# Altium PCB PCB.PcbDoc (part 4 of 4)
Units mm, origin at the board's own origin, x right, y up, seen from the top; angles counter-clockwise.
Board outline 38 x 42 mm, 4 copper layers (Top Layer, Inner GND 1, Inner GND 2, Bottom Layer), stack 1.62 mm thick; 195 components, 172 nets, 763 pads, 474 vias.
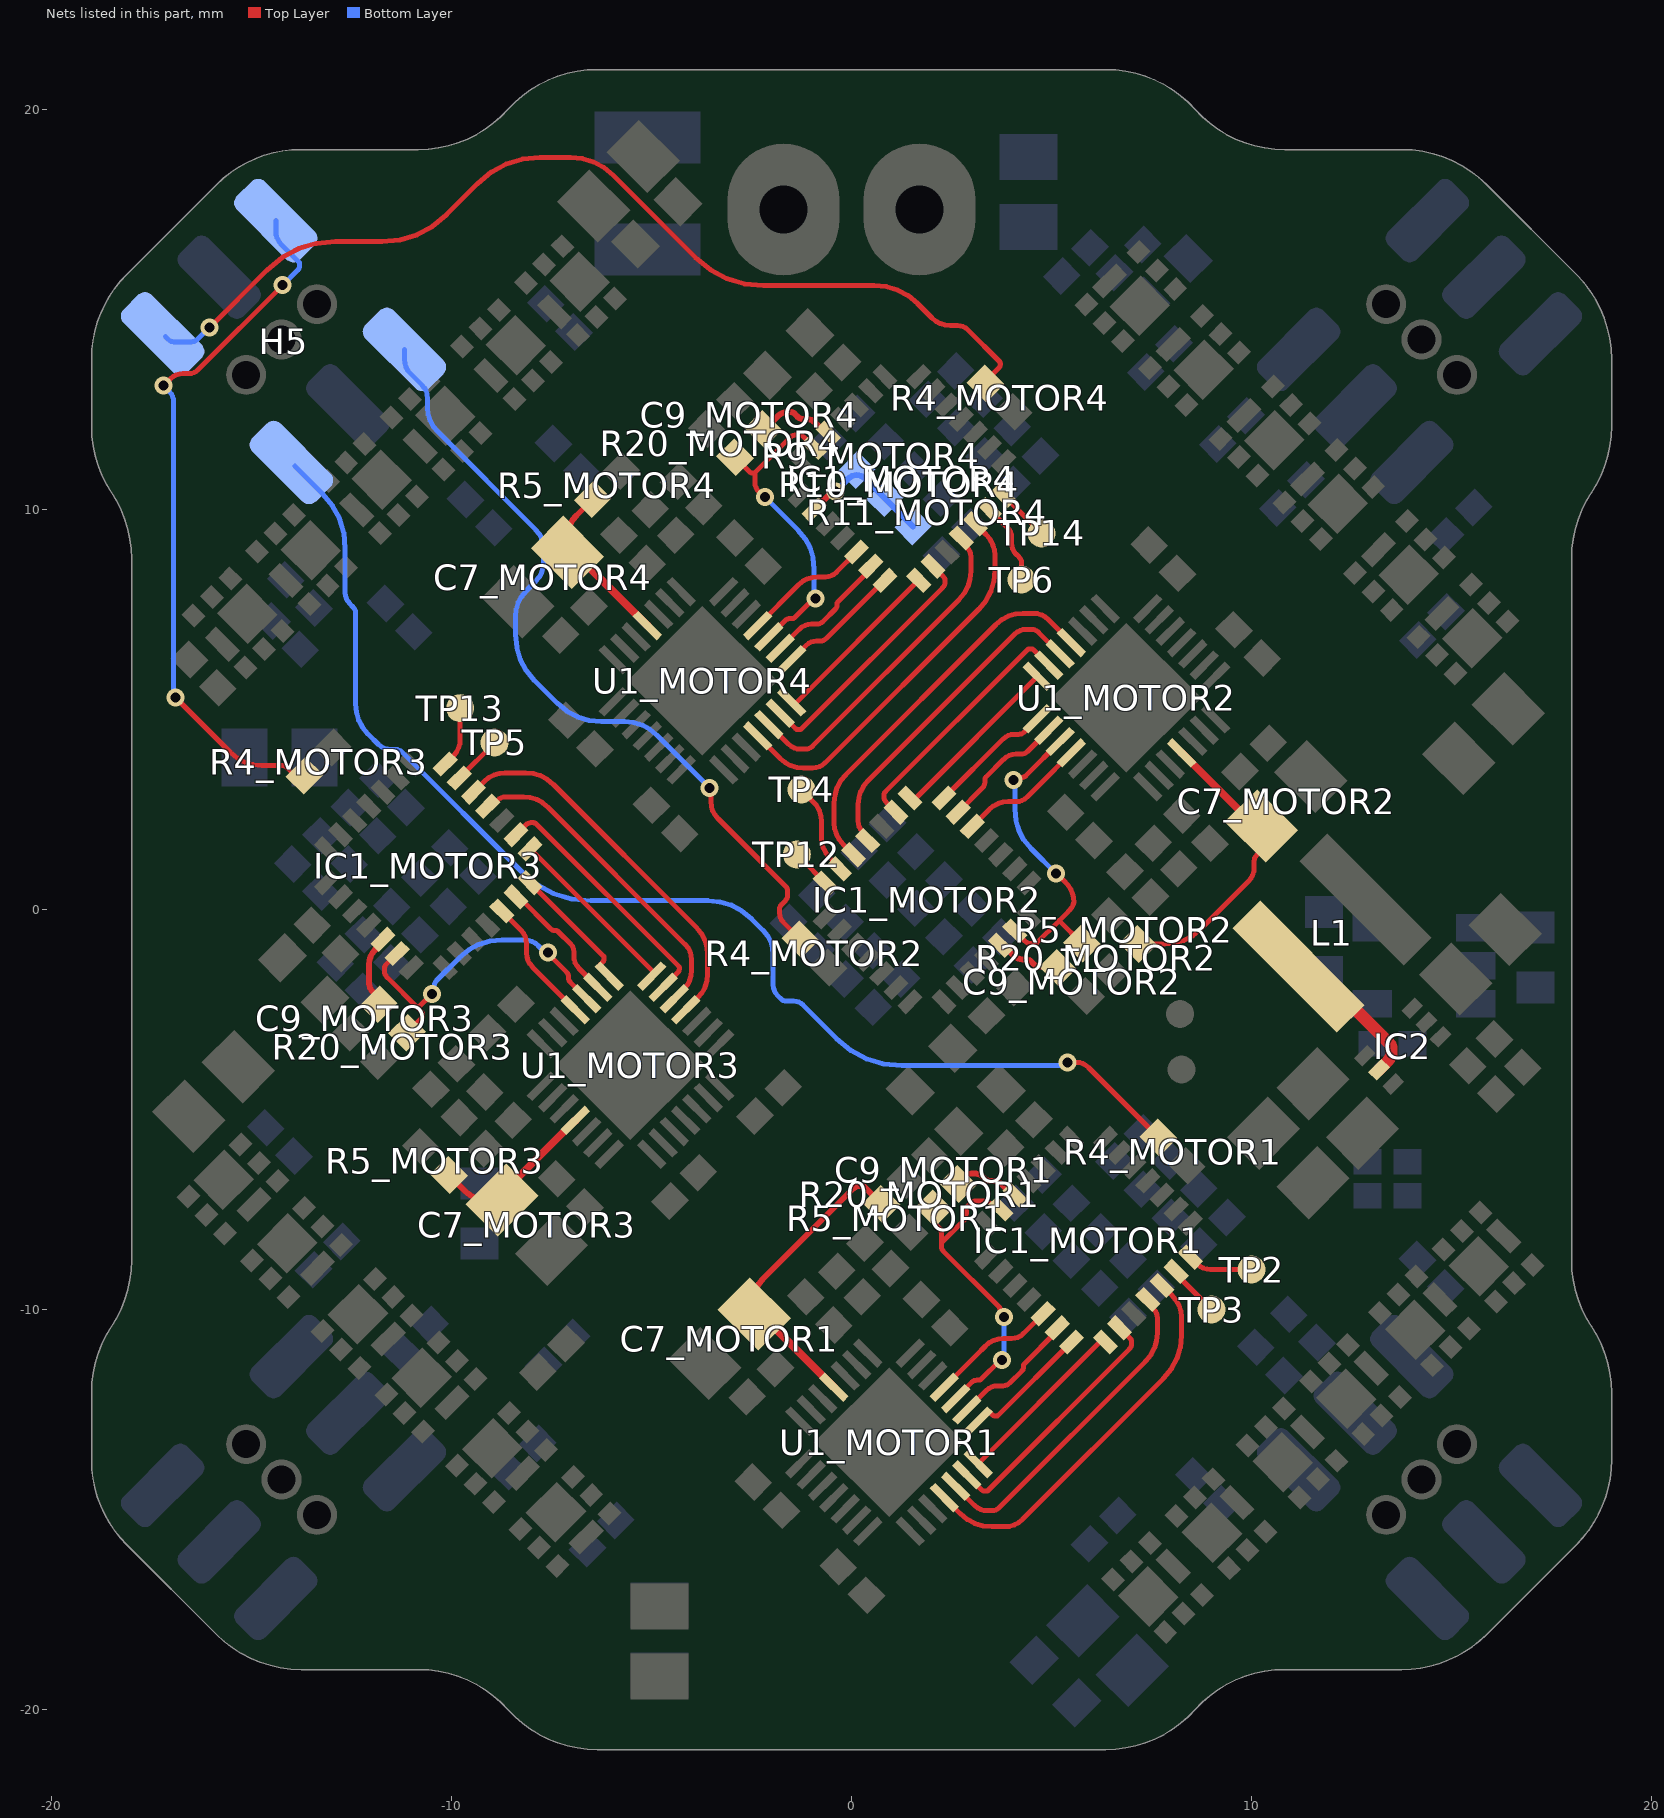
[diagram p6: the nets of this part, all layers, seen from the top]

## Via types
v1: diameter 0.45, hole 0.25, Top Layer to Bottom Layer, tented both sides, 381 vias
v2: diameter 0.55, hole 0.25, Top Layer to Bottom Layer, tented both sides, 93 vias

## Nets (pads, with @x,y where several pads share a name; then routed paths per layer and width w, separated by ;. In a path a pad name is that pad's centre, name@x,y a point inside that pad or via, vN(x,y) a via of type N, cw(c..) or ccw(c..) an arc to the next point about the centre after c; other vN are vias at no path point) (continued)
STM_BEMF_REF_MOTOR4: IC1_MOTOR4.9 R9_MOTOR4.2 R10_MOTOR4.2 R11_MOTOR4.2 | length 3.3
  Top Layer w0.15: IC1_MOTOR4.9@-0.934,9.998 -0.497,10.435 -0.485,10.445 -0.472,10.452 -0.458,10.456 -0.443,10.457 v1(-0.404,10.457)
  Bottom Layer w0.15: v1(-0.404,10.457) -0.112,10.749 0.007,10.838 0.126,10.868 0.246,10.838 0.365,10.749 R11_MOTOR4.2@1.541,9.573
STM_DSHOT1: H5.4 R4_MOTOR1.2 | length 31.7
  Top Layer w0.125: v1(5.4,-3.821) 5.619,-3.821 5.705,-3.829 5.785,-3.853 5.858,-3.892 5.925,-3.948 R4_MOTOR1.2@7.674,-5.697
  Bottom Layer w0.125: H5.4@-13.917,11.089 -13.225,10.397 -12.977,10.099 -12.8,9.772 -12.694,9.415 -12.659,9.029 -12.659,7.923 -12.652,7.844 -12.63,7.771 -12.593,7.704 -12.542,7.642 -12.464,7.564 -12.436,7.53 -12.416,7.493 -12.404,7.453 -12.4,7.409 -12.4,5.145 -12.38,4.931 -12.321,4.733 -12.223,4.551 -12.085,4.385 -11.827,4.127 -11.76,4.072 -11.687,4.032 -11.607,4.008 -11.52,4 -11.399,4 -11.351,3.996 -11.307,3.982 -11.267,3.961 -11.23,3.93 -8.228,0.928 -7.856,0.618 -7.447,0.397 -7.002,0.265 -6.52,0.22 -3.589,0.22 -3.283,0.192 -3.001,0.108 -2.742,-0.032 -2.506,-0.228 -2.205,-0.529 -2.097,-0.659 -2.02,-0.801 -1.974,-0.956 -1.959,-1.124 -1.959,-1.882 -1.951,-1.959 -1.93,-2.03 -1.895,-2.095 -1.846,-2.154 -1.77,-2.23 -1.738,-2.257 -1.702,-2.276 -1.663,-2.288 -1.621,-2.291 -1.449,-2.291 -1.381,-2.298 -1.319,-2.316 -1.261,-2.347 -1.209,-2.391 -0.379,-3.221 -0.022,-3.518 0.37,-3.73 0.798,-3.858 1.26,-3.9 5.271,-3.9 5.295,-3.898 5.317,-3.891 5.338,-3.88 5.357,-3.864 v1(5.4,-3.821)
STM_DSHOT2: H5.6 R4_MOTOR2.2 | length 20.2
  Top Layer w0.125: v1(-3.546,3.037) -3.53,3.021 -3.525,3.015 -3.521,3.007 -3.518,2.999 -3.517,2.99 -3.517,2.702 -3.506,2.581 -3.473,2.47 -3.418,2.368 -3.34,2.274 -2.866,1.8 -1.652,0.587 -1.629,0.559 -1.613,0.529 -1.603,0.496 -1.6,0.46 -1.6,0.37 -1.604,0.324 -1.617,0.283 -1.637,0.244 -1.666,0.209 -1.748,0.128 -1.771,0.101 -1.787,0.07 -1.797,0.037 -1.8,0.002 -1.8,-0.089 -1.794,-0.154 -1.776,-0.214 -1.746,-0.269 -1.705,-0.319 R4_MOTOR2.2@-1.283,-0.741
  Bottom Layer w0.125: H5.6@-11.177,14.006 -11.177,13.755 -11.168,13.657 -11.141,13.566 -11.096,13.482 -11.033,13.406 -10.735,13.109 -10.676,13.037 -10.634,12.959 -10.608,12.874 -10.6,12.782 -10.6,12.548 -10.585,12.38 -10.538,12.225 -10.462,12.083 -10.354,11.954 -7.898,9.498 -7.811,9.394 -7.749,9.28 -7.712,9.155 -7.7,9.02 -7.7,8.678 -7.712,8.544 -7.749,8.42 -7.811,8.307 -7.897,8.203 -8.137,7.963 -8.252,7.824 -8.334,7.673 -8.384,7.508 -8.4,7.329 -8.4,6.875 -8.37,6.55 -8.281,6.249 -8.132,5.974 -7.923,5.723 -7.36,5.16 -7.118,4.959 -6.852,4.815 -6.563,4.729 -6.249,4.7 -5.677,4.7 -5.452,4.679 -5.243,4.617 -5.052,4.514 -4.878,4.369 v1(-3.546,3.037)
STM_DSHOT3: H5.3 R4_MOTOR3.2 | length 17.9
  Top Layer w0.125: v1(-17.2,13.1) -17.035,13.265 -16.964,13.324 -16.886,13.366 -16.801,13.392 -16.709,13.4 -16.557,13.4 -16.497,13.406 -16.441,13.422 -16.39,13.45 -16.344,13.488 v1(-14.221,15.612) ; v1(-16.9,5.3) -15.527,3.927 -15.355,3.784 -15.166,3.682 -14.96,3.62 -14.737,3.6 -14.211,3.6 -14.192,3.598 -14.175,3.593 -14.159,3.584 -14.144,3.572 -14.113,3.541 -14.112,3.54 -14.11,3.539 -14.108,3.539 -14.106,3.538 -14.103,3.538 ; -14.099,3.537 -13.982,3.42 -13.944,3.388 -13.901,3.365 -13.855,3.351 -13.805,3.346 R4_MOTOR3.2@-13.679,3.346
  Bottom Layer w0.125: v1(-17.2,13.1) -17.062,12.962 -17.012,12.902 -16.977,12.837 -16.956,12.766 -16.949,12.689 -16.949,5.38 -16.947,5.365 -16.943,5.351 -16.936,5.338 -16.927,5.327 v1(-16.9,5.3) ; H5.3@-14.395,17.223 -14.395,16.973 -14.386,16.874 -14.358,16.783 -14.313,16.699 -14.25,16.623 -13.825,16.198 -13.814,16.185 -13.806,16.171 -13.802,16.155 -13.8,16.138 -13.8,16.096 -13.803,16.065 -13.811,16.037 -13.825,16.011 -13.845,15.987 v1(-14.221,15.612)
STM_DSHOT4: H5.1 R4_MOTOR4.2 | length 25
  Top Layer w0.125: v1(-16.049,14.549) -16.049,14.551 -14.607,15.993 -14.235,16.302 -13.827,16.523 -13.382,16.656 -12.9,16.7 -11.745,16.7 -11.29,16.742 -10.869,16.867 -10.483,17.076 -10.132,17.368 -9.344,18.156 -9.005,18.438 -8.633,18.639 -8.228,18.76 -7.789,18.8 -7.025,18.8 -6.724,18.772 -6.446,18.69 -6.19,18.551 -5.958,18.358 -3.907,16.307 -3.535,15.998 -3.127,15.777 -2.682,15.644 -2.2,15.6 0.564,15.6 0.87,15.572 1.153,15.488 1.413,15.347 1.65,15.15 2.009,14.791 2.109,14.707 2.22,14.648 2.34,14.612 2.47,14.6 2.652,14.6 2.723,14.593 2.789,14.574 2.85,14.541 2.905,14.495 3.699,13.701 3.707,13.691 3.713,13.681 3.716,13.669 3.717,13.657 3.717,13.626 3.715,13.603 3.709,13.582 3.699,13.563 3.685,13.546 3.364,13.225 3.356,13.216 3.351,13.206 3.348,13.195 3.346,13.183 R4_MOTOR4.2@3.346,13.154
  Bottom Layer w0.125: H5.1@-17.155,14.327 -17.081,14.252 -17.049,14.226 -17.014,14.207 -16.976,14.195 -16.934,14.192 -16.508,14.192 -16.466,14.195 -16.428,14.207 -16.393,14.226 -16.361,14.252 -16.287,14.327 -16.285,14.327 -16.067,14.545 -16.064,14.547 -16.062,14.548 -16.059,14.549 -16.056,14.549 v1(-16.049,14.549)
STM_MP_HA_MOTOR1: IC1_MOTOR1.16 U1_MOTOR1.20 | length 6.4
  Top Layer w0.125: U1_MOTOR1.20@2.881,-14.134 3.256,-14.509 3.274,-14.523 3.293,-14.534 3.313,-14.54 3.336,-14.542 3.367,-14.542 3.379,-14.541 3.391,-14.537 3.401,-14.532 3.411,-14.524 6.941,-10.994 6.966,-10.963 6.984,-10.93 6.995,-10.894 6.999,-10.855 6.999,-10.801 6.997,-10.779 6.991,-10.759 6.981,-10.741 6.967,-10.724 IC1_MOTOR1.16@6.7,-10.457
STM_MP_HA_MOTOR2: IC1_MOTOR2.16 U1_MOTOR2.20 | length 6.4
  Top Layer w0.125: IC1_MOTOR2.16@1.11,2.434 0.869,2.675 0.844,2.705 0.826,2.738 0.815,2.775 0.812,2.814 0.812,2.868 0.813,2.89 0.819,2.91 0.829,2.928 0.843,2.944 4.384,6.486 4.402,6.5 4.421,6.51 4.441,6.516 4.464,6.519 4.495,6.519 4.508,6.517 4.519,6.514 4.529,6.508 4.539,6.5 U1_MOTOR2.20@4.929,6.111
STM_MP_HA_MOTOR3: IC1_MOTOR3.16 U1_MOTOR3.20 | length 6.4
  Top Layer w0.125: IC1_MOTOR3.16@-8.391,1.873 -8.149,2.115 -8.119,2.14 -8.086,2.158 -8.05,2.168 -8.011,2.172 -7.956,2.172 -7.935,2.17 -7.915,2.164 -7.897,2.154 -7.88,2.14 -4.324,-1.416 -4.316,-1.425 -4.311,-1.436 -4.307,-1.447 -4.306,-1.459 -4.306,-1.491 -4.308,-1.513 -4.314,-1.534 -4.325,-1.553 -4.339,-1.57 U1_MOTOR3.20@-4.714,-1.945
STM_MP_HA_MOTOR4: IC1_MOTOR4.16 U1_MOTOR4.20 | length 6.4
  Top Layer w0.125: U1_MOTOR4.20@-1.783,4.906 -1.408,4.532 -1.391,4.517 -1.372,4.507 -1.351,4.501 -1.328,4.499 -1.297,4.499 -1.285,4.5 -1.273,4.503 -1.263,4.509 -1.253,4.517 2.277,8.047 2.302,8.077 2.32,8.11 2.331,8.146 2.334,8.186 2.334,8.24 2.332,8.262 2.326,8.281 2.317,8.3 2.303,8.316 IC1_MOTOR4.16@2.036,8.583
STM_MP_HB_MOTOR1: IC1_MOTOR1.18 U1_MOTOR1.19 | length 8.2
  Top Layer w0.125: U1_MOTOR1.19@2.598,-14.417 3.083,-14.902 3.15,-14.957 3.224,-14.997 3.305,-15.021 3.392,-15.029 3.513,-15.029 3.561,-15.025 3.605,-15.012 3.646,-14.99 3.683,-14.959 7.353,-11.289 7.481,-11.135 7.572,-10.966 7.627,-10.783 7.645,-10.584 7.645,-10.212 7.639,-10.148 7.622,-10.089 7.592,-10.034 7.551,-9.985 7.436,-9.869 7.423,-9.854 7.414,-9.838 7.409,-9.819 7.407,-9.8 IC1_MOTOR1.18@7.407,-9.75
STM_MP_HB_MOTOR2: IC1_MOTOR2.18 U1_MOTOR2.19 | length 8.2
  Top Layer w0.125: IC1_MOTOR2.18@0.403,1.727 0.403,1.776 0.401,1.796 0.396,1.814 0.387,1.831 0.374,1.846 0.272,1.948 0.225,2.005 0.192,2.067 0.172,2.134 0.165,2.207 0.165,2.628 0.18,2.795 0.226,2.948 0.302,3.089 0.409,3.217 4.07,6.878 4.137,6.934 4.211,6.974 4.291,6.998 4.378,7.006 4.5,7.006 4.548,7.001 4.592,6.988 4.632,6.966 4.669,6.936 U1_MOTOR2.19@5.212,6.394
STM_MP_HB_MOTOR3: IC1_MOTOR3.18 U1_MOTOR3.19 | length 8.1
  Top Layer w0.125: IC1_MOTOR3.18@-9.098,2.58 -9.048,2.58 -9.029,2.582 -9.01,2.588 -8.994,2.597 -8.979,2.609 -8.863,2.724 -8.814,2.766 -8.759,2.795 -8.7,2.813 -8.636,2.819 -8.204,2.819 -8.034,2.803 -7.877,2.756 -7.733,2.678 -7.602,2.569 -4.156,-0.877 -4.088,-0.959 -4.039,-1.049 -4.01,-1.147 -4,-1.253 -4,-1.523 -4.012,-1.655 -4.048,-1.777 -4.109,-1.889 -4.194,-1.991 U1_MOTOR3.19@-4.431,-2.228
STM_MP_HB_MOTOR4: IC1_MOTOR4.18 U1_MOTOR4.19 | length 8.2
  Top Layer w0.125: U1_MOTOR4.19@-2.066,4.624 -1.581,4.139 -1.514,4.083 -1.44,4.043 -1.36,4.019 -1.273,4.011 -1.151,4.011 -1.103,4.016 -1.059,4.029 -1.018,4.051 -0.981,4.082 2.689,7.752 2.817,7.906 2.908,8.074 2.963,8.258 2.981,8.457 2.981,8.828 2.975,8.893 2.957,8.952 2.928,9.006 2.887,9.056 2.771,9.171 2.759,9.186 2.75,9.203 2.744,9.221 2.743,9.241 IC1_MOTOR4.18@2.743,9.291
STM_MP_HC_MOTOR1: IC1_MOTOR1.19 U1_MOTOR1.18 | length 9.9
  Top Layer w0.125: U1_MOTOR1.18@2.316,-14.7 2.717,-15.101 2.89,-15.245 3.079,-15.347 3.286,-15.409 3.509,-15.429 3.828,-15.429 3.954,-15.418 4.07,-15.383 4.176,-15.326 4.273,-15.245 7.802,-11.716 7.996,-11.483 8.134,-11.227 8.218,-10.948 8.245,-10.647 8.245,-10.19 8.232,-10.041 8.191,-9.904 8.122,-9.778 8.027,-9.663 IC1_MOTOR1.19@7.76,-9.396
STM_MP_HC_MOTOR2: IC1_MOTOR2.19 U1_MOTOR2.18 | length 9.8
  Top Layer w0.125: IC1_MOTOR2.19@0.05,1.373 -0.217,1.64 -0.312,1.754 -0.381,1.88 -0.422,2.018 -0.435,2.166 -0.435,2.669 -0.417,2.867 -0.362,3.05 -0.272,3.218 -0.144,3.371 3.612,7.128 3.759,7.249 3.919,7.336 4.094,7.388 4.284,7.406 4.548,7.406 4.653,7.396 4.749,7.368 4.837,7.32 4.918,7.253 U1_MOTOR2.18@5.494,6.676
STM_MP_HC_MOTOR3: IC1_MOTOR3.19 U1_MOTOR3.18 | length 9.6
  Top Layer w0.125: IC1_MOTOR3.19@-9.452,2.934 -9.185,3.201 -9.07,3.296 -8.944,3.364 -8.807,3.405 -8.658,3.419 -8.156,3.419 -7.957,3.401 -7.774,3.346 -7.606,3.255 -7.454,3.128 -3.883,-0.443 -3.759,-0.592 -3.671,-0.755 -3.618,-0.933 -3.6,-1.125 -3.6,-1.614 -3.615,-1.782 -3.662,-1.937 -3.739,-2.08 -3.847,-2.209 U1_MOTOR3.18@-4.148,-2.511
STM_MP_HC_MOTOR4: IC1_MOTOR4.19 U1_MOTOR4.18 | length 9.9
  Top Layer w0.125: U1_MOTOR4.18@-2.349,4.341 -1.788,3.781 -1.661,3.675 -1.522,3.6 -1.37,3.555 -1.206,3.54 -0.977,3.54 -0.887,3.548 -0.803,3.573 -0.727,3.614 -0.657,3.672 3.184,7.513 3.357,7.722 3.482,7.951 3.556,8.201 3.581,8.472 3.581,8.851 3.567,8.999 3.526,9.137 3.458,9.263 3.363,9.377 IC1_MOTOR4.19@3.096,9.644
STM_MP_LA_MOTOR1: IC1_MOTOR1.13 U1_MOTOR1.23 | length 3.2
  Top Layer w0.125: U1_MOTOR1.23@2.881,-12.508 3.355,-12.034 3.422,-11.978 3.496,-11.939 3.576,-11.915 3.662,-11.907 3.784,-11.907 3.831,-11.902 3.875,-11.889 3.916,-11.867 3.953,-11.837 4.263,-11.526 4.28,-11.506 4.291,-11.485 4.298,-11.461 4.301,-11.436 4.301,-11.4 4.302,-11.386 4.306,-11.373 4.312,-11.362 4.321,-11.351 5.122,-10.55 5.131,-10.539 5.138,-10.526 5.143,-10.511 5.144,-10.496 IC1_MOTOR1.13@5.144,-10.457
STM_MP_LA_MOTOR2: IC1_MOTOR2.13 U1_MOTOR2.23 | length 3.2
  Top Layer w0.125: IC1_MOTOR2.13@2.666,2.434 3.27,3.038 3.297,3.07 3.315,3.104 3.326,3.142 3.33,3.183 3.33,3.24 3.332,3.262 3.338,3.283 3.349,3.302 3.363,3.319 3.8,3.756 3.867,3.812 3.941,3.851 4.021,3.875 4.108,3.883 4.229,3.883 4.276,3.888 4.32,3.901 4.361,3.923 4.398,3.953 U1_MOTOR2.23@4.929,4.484
STM_MP_LA_MOTOR3: IC1_MOTOR3.13 U1_MOTOR3.23 | length 3.2
  Top Layer w0.125: IC1_MOTOR3.13@-8.391,0.318 -8.352,0.318 -8.337,0.316 -8.322,0.312 -8.309,0.305 -8.298,0.295 -7.514,-0.488 -7.494,-0.505 -7.473,-0.516 -7.449,-0.523 -7.424,-0.526 -7.388,-0.526 -7.374,-0.527 -7.362,-0.531 -7.35,-0.537 -7.339,-0.546 -7.011,-0.874 -6.981,-0.911 -6.959,-0.951 -6.946,-0.995 -6.941,-1.043 -6.941,-1.164 -6.933,-1.251 -6.909,-1.331 -6.87,-1.404 -6.814,-1.471 U1_MOTOR3.23@-6.34,-1.945
STM_MP_LA_MOTOR4: IC1_MOTOR4.13 U1_MOTOR4.23 | length 3.2
  Top Layer w0.125: U1_MOTOR4.23@-1.783,6.533 -1.309,7.007 -1.242,7.062 -1.169,7.102 -1.088,7.126 -1.002,7.134 -0.881,7.134 -0.833,7.138 -0.789,7.151 -0.748,7.173 -0.712,7.204 -0.401,7.515 -0.384,7.534 -0.373,7.556 -0.366,7.579 -0.363,7.605 -0.363,7.64 -0.362,7.654 -0.358,7.667 -0.352,7.679 -0.343,7.69 0.457,8.49 0.467,8.502 0.474,8.515 0.478,8.529 0.48,8.545 IC1_MOTOR4.13@0.48,8.583
STM_MP_LB_MOTOR1: IC1_MOTOR1.14 U1_MOTOR1.22 | length 3.2
  Top Layer w0.125: U1_MOTOR1.22@3.164,-12.791 3.377,-12.578 3.386,-12.57 3.396,-12.565 3.406,-12.562 3.418,-12.561 3.434,-12.561 3.44,-12.561 3.446,-12.563 3.451,-12.566 3.456,-12.57 3.513,-12.626 3.53,-12.641 3.549,-12.651 3.57,-12.657 3.592,-12.659 3.623,-12.659 3.636,-12.658 3.647,-12.655 3.658,-12.649 3.667,-12.641 IC1_MOTOR1.14@5.498,-10.811
STM_MP_LB_MOTOR2: IC1_MOTOR2.14 U1_MOTOR2.22 | length 3.1
  Top Layer w0.125: IC1_MOTOR2.14@2.312,2.787 3.792,4.267 3.851,4.316 3.916,4.351 3.987,4.372 4.063,4.379 4.17,4.379 4.213,4.383 4.252,4.395 4.287,4.414 4.32,4.441 U1_MOTOR2.22@4.646,4.767
STM_MP_LB_MOTOR3: IC1_MOTOR3.14 U1_MOTOR3.22 | length 3.2
  Top Layer w0.125: IC1_MOTOR3.14@-8.037,0.671 -6.207,-1.159 -6.199,-1.169 -6.193,-1.179 -6.19,-1.191 -6.189,-1.203 -6.189,-1.234 -6.191,-1.257 -6.197,-1.278 -6.207,-1.297 -6.222,-1.314 -6.278,-1.37 -6.282,-1.375 -6.285,-1.38 -6.287,-1.386 -6.287,-1.393 -6.287,-1.409 -6.286,-1.42 -6.283,-1.431 -6.278,-1.441 -6.27,-1.449 U1_MOTOR3.22@-6.057,-1.662
STM_MP_LB_MOTOR4: IC1_MOTOR4.14 U1_MOTOR4.22 | length 3.1
  Top Layer w0.125: U1_MOTOR4.22@-1.5,6.25 -1.495,6.25 -1.493,6.25 -1.492,6.251 -1.49,6.251 -1.489,6.253 -1.134,6.608 -1.078,6.654 -1.017,6.687 -0.951,6.707 -0.879,6.713 -0.779,6.713 -0.739,6.717 -0.703,6.728 -0.669,6.746 -0.638,6.771 0.816,8.226 0.818,8.228 0.821,8.229 0.823,8.23 0.826,8.23 IC1_MOTOR4.14@0.833,8.23
STM_MP_LC_MOTOR1: IC1_MOTOR1.15 U1_MOTOR1.21 | length 4.4
  Top Layer w0.125: U1_MOTOR1.21@3.164,-13.851 6.174,-10.841 6.195,-10.824 6.218,-10.812 6.242,-10.804 6.269,-10.802 6.332,-10.802 6.334,-10.802 6.337,-10.803 6.339,-10.804 6.341,-10.806 IC1_MOTOR1.15@6.346,-10.811
STM_MP_LC_MOTOR2: IC1_MOTOR2.15 U1_MOTOR2.21 | length 4.4
  Top Layer w0.125: IC1_MOTOR2.15@1.464,2.787 1.469,2.782 1.471,2.781 1.473,2.779 1.476,2.779 1.478,2.778 1.543,2.778 1.569,2.781 1.593,2.788 1.614,2.8 1.634,2.816 U1_MOTOR2.21@4.646,5.828
STM_MP_LC_MOTOR3: IC1_MOTOR3.15 U1_MOTOR3.21 | length 4.5
  Top Layer w0.125: IC1_MOTOR3.15@-8.032,1.52 -4.959,-1.553 -4.955,-1.558 -4.952,-1.563 -4.95,-1.569 -4.95,-1.575 -4.95,-1.591 -4.951,-1.603 -4.954,-1.614 -4.959,-1.623 -4.967,-1.632 U1_MOTOR3.21@-4.997,-1.662
STM_MP_LC_MOTOR4: IC1_MOTOR4.15 U1_MOTOR4.21 | length 4.5
  Top Layer w0.125: U1_MOTOR4.21@-1.5,5.189 -1.477,5.167 -1.469,5.159 -1.459,5.154 -1.448,5.151 -1.437,5.15 -1.421,5.15 -1.414,5.15 -1.408,5.152 -1.403,5.155 -1.398,5.159 IC1_MOTOR4.15@1.673,8.23
STM_MP_NFAULT_MOTOR1: IC1_MOTOR1.6 R20_MOTOR1.1 U1_MOTOR1.24 | length 8.2
  Top Layer w0.125: R20_MOTOR1.1@2.057,-7.469 2.057,-7.765 2.059,-7.789 2.065,-7.811 2.077,-7.832 2.092,-7.851 2.134,-7.893 ; 2.136,-7.896 2.136,-7.899 2.136,-7.901 2.136,-7.902 2.137,-7.904 2.138,-7.905 2.197,-7.964 2.218,-7.989 2.233,-8.017 2.242,-8.047 2.245,-8.08 2.245,-8.336 ; U1_MOTOR1.24@2.598,-12.225 3.007,-11.816 3.034,-11.794 3.063,-11.778 3.095,-11.768 3.13,-11.765 3.178,-11.765 3.197,-11.764 3.215,-11.758 3.231,-11.75 3.246,-11.737 3.706,-11.277 3.713,-11.272 3.72,-11.268 3.728,-11.265 3.737,-11.264 v1(3.759,-11.264) ; IC1_MOTOR1.6@3.73,-7.487 3.662,-7.487 3.635,-7.485 3.61,-7.477 3.588,-7.465 3.567,-7.448 3.494,-7.375 3.445,-7.334 3.392,-7.306 3.334,-7.288 3.271,-7.283 3.112,-7.283 3.075,-7.286 3.041,-7.296 3.01,-7.313 2.981,-7.337 2.915,-7.403 2.894,-7.428 2.88,-7.454 2.872,-7.483 2.869,-7.514 2.869,-7.594 2.863,-7.651 2.848,-7.704 2.822,-7.752 2.785,-7.796 2.245,-8.336 ; v1(3.809,-10.181) 3.809,-10.133 3.807,-10.114 3.802,-10.096 3.793,-10.08 3.781,-10.065 3.716,-10.001 3.711,-9.995 3.708,-9.988 3.705,-9.98 3.705,-9.972 3.705,-9.961 3.704,-9.957 3.703,-9.953 3.701,-9.949 3.698,-9.946 2.295,-8.542 2.273,-8.516 2.257,-8.487 2.248,-8.456 2.245,-8.422 2.245,-8.336
  Bottom Layer w0.125: v1(3.759,-11.264) 3.787,-11.237 3.796,-11.225 3.803,-11.212 3.808,-11.198 3.809,-11.183 v1(3.809,-10.181)
STM_MP_NFAULT_MOTOR2: IC1_MOTOR2.6 R20_MOTOR2.1 U1_MOTOR2.24 | length 8
  Top Layer w0.125: v1(4.051,3.241) 4.085,3.275 4.1,3.287 4.116,3.296 4.134,3.301 4.153,3.303 4.241,3.303 4.276,3.306 4.308,3.316 4.337,3.332 4.364,3.354 U1_MOTOR2.24@5.212,4.201 ; IC1_MOTOR2.6@4.08,-0.536 4.331,-0.787 4.366,-0.816 4.405,-0.837 4.448,-0.85 4.494,-0.854 4.558,-0.854 4.583,-0.852 4.607,-0.845 4.62,-0.845 5.188,-0.276 ; v1(5.116,0.898) 5.127,0.898 5.132,0.897 5.136,0.896 5.14,0.894 5.143,0.891 ccw(c5.149,0.891) 5.145,0.887 5.354,0.678 cw(c4.863,0.186) 5.558,0.186 5.536,0.112 5.499,0.045 5.448,-0.017 ; 5.426,-0.039 5.188,-0.276 ; R20_MOTOR2.1@5.761,-0.849 5.188,-0.276
  Bottom Layer w0.125: v1(4.051,3.241) 4.067,3.225 4.073,3.218 4.077,3.21 4.079,3.202 4.08,3.193 4.08,2.508 4.106,2.231 4.182,1.975 4.309,1.74 4.487,1.526 v1(5.116,0.898)
STM_MP_NFAULT_MOTOR3: IC1_MOTOR3.6 R20_MOTOR3.1 U1_MOTOR3.24 | length 8.3
  Top Layer w0.125: IC1_MOTOR3.6@-11.361,-1.097 -11.642,-1.378 -11.658,-1.397 -11.67,-1.419 -11.677,-1.442 -11.679,-1.467 -11.679,-1.532 -11.675,-1.577 -11.662,-1.62 -11.641,-1.659 -11.611,-1.694 -10.844,-2.462 ; R20_MOTOR3.1@-11.113,-3.077 -10.758,-2.721 -10.743,-2.704 -10.733,-2.684 -10.726,-2.663 -10.724,-2.64 -10.724,-2.608 -10.725,-2.595 -10.729,-2.583 -10.735,-2.573 -10.743,-2.563 -10.844,-2.462 ; v1(-10.491,-2.109) -10.844,-2.462 ; v1(-7.584,-1.067) -7.584,-1.09 -7.583,-1.098 -7.58,-1.106 -7.576,-1.114 -7.571,-1.121 -7.111,-1.581 -7.098,-1.595 -7.09,-1.612 -7.084,-1.629 -7.083,-1.648 -7.083,-1.697 -7.08,-1.731 -7.07,-1.763 -7.054,-1.792 -7.032,-1.819 U1_MOTOR3.24@-6.623,-2.228
  Bottom Layer w0.125: v1(-10.491,-2.109) -10.459,-2.077 -10.448,-2.064 -10.44,-2.049 -10.435,-2.032 -10.433,-2.015 -10.433,-1.915 -10.43,-1.876 -10.419,-1.839 -10.401,-1.806 -10.376,-1.776 -9.802,-1.202 -9.571,-1.01 -9.316,-0.872 -9.039,-0.789 -8.739,-0.762 -8.172,-0.762 -8.078,-0.77 -7.991,-0.796 -7.912,-0.839 -7.84,-0.899 -7.7,-1.039 -7.685,-1.052 -7.669,-1.06 -7.651,-1.066 -7.632,-1.067 v1(-7.584,-1.067)
STM_MP_NFAULT_MOTOR4: IC1_MOTOR4.6 R20_MOTOR4.1 U1_MOTOR4.24 | length 7.9
  Top Layer w0.125: R20_MOTOR4.1@-2.914,11.306 -2.559,10.951 -2.541,10.936 -2.522,10.925 -2.501,10.919 -2.478,10.917 -2.419,10.917 ; v1(-2.169,10.319) -2.18,10.319 -2.185,10.319 -2.189,10.32 -2.193,10.322 -2.196,10.325 -2.316,10.445 -2.361,10.499 -2.393,10.559 -2.413,10.624 -2.419,10.694 -2.419,10.917 ; U1_MOTOR4.24@-2.066,6.816 -1.657,7.224 -1.63,7.247 -1.601,7.263 -1.569,7.272 -1.534,7.275 -1.486,7.275 -1.467,7.277 -1.449,7.282 -1.433,7.291 -1.418,7.303 -0.958,7.763 -0.951,7.769 -0.944,7.773 -0.936,7.775 -0.927,7.776 v1(-0.905,7.776) ; IC1_MOTOR4.6@-0.934,11.553 -1.215,11.834 -1.235,11.851 -1.256,11.862 -1.28,11.869 -1.305,11.871 -1.369,11.871 -1.415,11.867 -1.458,11.855 -1.497,11.834 -1.532,11.804 -2.419,10.917
  Bottom Layer w0.125: v1(-2.169,10.319) -1.335,9.485 -1.16,9.274 -1.035,9.043 -0.959,8.79 -0.934,8.517 -0.934,7.824 -0.934,7.815 -0.931,7.807 -0.927,7.799 -0.921,7.792 v1(-0.905,7.776)
STM_MP_NSLEEP_MOTOR1: IC1_MOTOR1.12 U1_MOTOR1.25 | length 3.2
  Top Layer w0.125: U1_MOTOR1.25@2.316,-11.942 3.118,-11.139 3.347,-10.91 3.446,-10.828 3.554,-10.77 3.672,-10.735 3.8,-10.723 4.004,-10.723 4.085,-10.715 4.159,-10.693 4.227,-10.656 4.289,-10.605 IC1_MOTOR1.12@4.791,-10.104
STM_MP_NSLEEP_MOTOR2: IC1_MOTOR2.12 U1_MOTOR2.25 | length 3.2
  Top Layer w0.125: IC1_MOTOR2.12@3.019,2.08 3.436,2.497 3.543,2.585 3.66,2.649 3.787,2.687 3.925,2.699 4.118,2.699 4.193,2.706 4.264,2.727 4.328,2.762 4.386,2.811 4.692,3.116 U1_MOTOR2.25@5.494,3.919
STM_MP_NSLEEP_MOTOR3: IC1_MOTOR3.12 U1_MOTOR3.25 | length 3.2
  Top Layer w0.125: IC1_MOTOR3.12@-8.744,-0.036 -8.263,-0.517 -8.203,-0.59 -8.16,-0.67 -8.134,-0.757 -8.125,-0.851 -8.125,-1.09 -8.116,-1.187 -8.09,-1.277 -8.045,-1.359 -7.982,-1.434 -7.808,-1.609 U1_MOTOR3.25@-6.906,-2.511
STM_MP_NSLEEP_MOTOR4: IC1_MOTOR4.12 U1_MOTOR4.25 | length 3.2
  Top Layer w0.125: U1_MOTOR4.25@-2.349,7.099 -1.332,8.115 -1.225,8.204 -1.108,8.267 -0.981,8.305 -0.843,8.318 -0.65,8.318 -0.575,8.325 -0.504,8.346 -0.44,8.38 -0.382,8.429 IC1_MOTOR4.12@0.126,8.937
STM_nRESET1: C9_MOTOR1.2 IC1_MOTOR1.5 | length 1.9
  Top Layer w0.15: C9_MOTOR1.2@2.489,-6.95 2.72,-6.719 2.781,-6.669 2.848,-6.632 2.921,-6.611 2.999,-6.603 3.109,-6.603 3.153,-6.607 3.193,-6.619 3.23,-6.639 3.263,-6.667 3.325,-6.729 3.352,-6.752 3.382,-6.767 3.414,-6.777 3.448,-6.78 3.567,-6.78 3.614,-6.784 3.657,-6.797 3.696,-6.819 3.733,-6.849 3.997,-7.113 4.008,-7.122 4.02,-7.129 4.033,-7.132 4.047,-7.134 IC1_MOTOR1.5@4.083,-7.134
STM_nRESET2: C9_MOTOR2.2 IC1_MOTOR2.5 | length 1.3
  Top Layer w0.15: IC1_MOTOR2.5@3.727,-0.89 3.763,-0.89 3.777,-0.891 3.79,-0.895 3.802,-0.901 3.813,-0.911 4.055,-1.152 4.103,-1.192 4.156,-1.22 4.213,-1.238 4.276,-1.243 4.363,-1.243 4.397,-1.246 4.428,-1.256 4.458,-1.272 4.484,-1.294 4.554,-1.363 4.584,-1.388 4.616,-1.406 4.652,-1.416 4.691,-1.42 C9_MOTOR2.2@4.886,-1.42
STM_nRESET3: C9_MOTOR3.2 IC1_MOTOR3.5 | length 1.9
  Top Layer w0.15: C9_MOTOR3.2@-11.767,-2.38 -11.767,-2.32 -11.769,-2.296 -11.776,-2.274 -11.787,-2.254 -11.802,-2.236 -11.933,-2.106 -11.992,-2.034 -12.034,-1.956 -12.059,-1.871 -12.068,-1.779 -12.068,-1.388 -12.058,-1.279 -12.028,-1.179 -11.978,-1.087 -11.909,-1.003 -11.735,-0.83 -11.726,-0.819 -11.719,-0.807 -11.716,-0.794 -11.714,-0.779 IC1_MOTOR3.5@-11.714,-0.743
STM_nRESET4: C9_MOTOR4.2 IC1_MOTOR4.5 | length 2.1
  Top Layer w0.15: C9_MOTOR4.2@-2.26,11.96 -2.237,11.96 -2.228,11.961 -2.219,11.963 -2.211,11.967 -2.204,11.973 -1.828,12.349 -1.782,12.388 -1.731,12.415 -1.676,12.432 -1.616,12.437 -1.533,12.437 -1.5,12.434 -1.47,12.425 -1.442,12.41 -1.416,12.389 -1.346,12.318 -1.315,12.293 -1.282,12.275 -1.245,12.264 -1.206,12.26 -1.093,12.26 -1.048,12.256 -1.007,12.244 -0.969,12.224 -0.935,12.195 -0.668,11.928 -0.657,11.919 -0.644,11.912 -0.631,11.908 -0.617,11.907 IC1_MOTOR4.5@-0.581,11.907
STM_SWCLK1: IC1_MOTOR1.21 TP2.1 | length 1.6
  Top Layer w0.125: IC1_MOTOR1.21@8.468,-8.689 8.638,-8.86 8.712,-8.921 8.793,-8.965 8.881,-8.991 8.976,-9 TP2.1@10,-9
STM_SWCLK2: IC1_MOTOR2.21 TP12.1 | length 1
  Top Layer w0.125: TP12.1@-1.308,1.383 ccw(c-1.147,1.383) -1.261,1.269 IC1_MOTOR2.21@-0.657,0.666
STM_SWCLK3: IC1_MOTOR3.21 TP13.1 | length 1.5
  Top Layer w0.125: IC1_MOTOR3.21@-10.159,3.641 -9.953,3.847 -9.879,3.936 -9.826,4.033 -9.795,4.139 -9.784,4.254 TP13.1@-9.784,5.034
STM_SWCLK4: IC1_MOTOR4.21 TP14.1 | length 1.5
  Top Layer w0.125: IC1_MOTOR4.21@3.803,10.351 4.701,9.454 4.722,9.428 4.738,9.399 4.747,9.368 4.75,9.335 TP14.1@4.75,9.25
STM_SWDIO1: IC1_MOTOR1.20 TP3.1 | length 1.3
  Top Layer w0.125: IC1_MOTOR1.20@8.114,-9.043 8.114,-9.082 8.115,-9.097 8.12,-9.112 8.127,-9.125 8.137,-9.137 TP3.1@9,-10
STM_SWDIO2: IC1_MOTOR2.20 TP4.1 | length 2.3
  Top Layer w0.125: TP4.1@-1.25,3 ccw(c-1.202,3) -1.236,2.966 -0.877,2.607 -0.806,2.477 -0.764,2.335 -0.75,2.182 -0.75,1.784 -0.737,1.647 -0.7,1.521 -0.637,1.405 -0.549,1.299 -0.315,1.065 -0.31,1.059 -0.307,1.053 -0.305,1.046 -0.304,1.038 IC1_MOTOR2.20@-0.304,1.019
STM_SWDIO3: IC1_MOTOR3.20 TP5.1 | length 1.3
  Top Layer w0.125: IC1_MOTOR3.20@-9.805,3.287 TP5.1@-8.921,4.172
STM_SWDIO4: IC1_MOTOR4.20 TP6.1 | length 2
  Top Layer w0.125: IC1_MOTOR4.20@3.45,9.998 3.908,9.539 3.948,9.491 3.977,9.438 3.994,9.38 4,9.318 4,9.159 4.007,9.082 4.028,9.012 4.063,8.947 4.112,8.888 4.188,8.812 4.215,8.779 4.235,8.744 4.246,8.705 4.25,8.662 TP6.1@4.25,8.25
SW: IC2.5 L1.1 | length 3.8
  Top Layer w0.3: L1.1@11.172,-1.425 11.366,-1.425 11.443,-1.432 11.513,-1.453 11.578,-1.488 11.637,-1.537 13.447,-3.347 13.47,-3.375 13.486,-3.404 13.496,-3.437 13.499,-3.472 13.499,-3.562 13.493,-3.626 13.476,-3.685 13.446,-3.739 13.405,-3.788 IC2.5@13.186,-4.008
VREG_MOTOR1: C7_MOTOR1.2 R5_MOTOR1.2 U1_MOTOR1.4 | length 7.5
  Top Layer w0.15: C7_MOTOR1.2@-2.436,-10.111 -2.436,-9.749 -2.423,-9.607 -2.384,-9.476 -2.319,-9.355 -2.227,-9.245 0.048,-6.97 0.08,-6.943 0.115,-6.924 0.153,-6.913 0.195,-6.909 0.252,-6.909 0.275,-6.911 0.296,-6.917 0.315,-6.928 0.332,-6.942 R5_MOTOR1.2@0.751,-7.36
  Top Layer w0.2: C7_MOTOR1.2@-2.155,-10.229 U1_MOTOR1.4@-0.442,-11.942
VREG_MOTOR2: C7_MOTOR2.2 R5_MOTOR2.2 U1_MOTOR2.4 | length 7.4
  Top Layer w0.125: R5_MOTOR2.2@7.163,-0.863 7.819,-0.863 8.077,-0.839 8.316,-0.768 8.535,-0.649 8.735,-0.483 9.922,0.704 9.984,0.779 10.029,0.861 10.055,0.951 10.064,1.048 10.064,1.215 10.068,1.253 10.078,1.288 10.096,1.321 10.121,1.35 10.158,1.388 10.172,1.404 10.182,1.422 10.187,1.442 10.189,1.463 10.189,1.918 10.187,1.939 10.182,1.959 10.172,1.977 10.158,1.993 10.121,2.031 10.098,2.073 10.144,2.087 C7_MOTOR2.2@10.246,2.087
  Top Layer w0.2: U1_MOTOR2.4@8.252,3.919 C7_MOTOR2.2@9.965,2.206
VREG_MOTOR3: C7_MOTOR3.2 R5_MOTOR3.2 U1_MOTOR3.4 | length 4
  Top Layer w0.15: R5_MOTOR3.2@-10.065,-6.635 -9.66,-7.04 -9.543,-7.137 -9.414,-7.207 -9.274,-7.249 -9.122,-7.263 C7_MOTOR3.2@-8.737,-7.263
  Top Layer w0.2: C7_MOTOR3.2@-8.619,-6.981 U1_MOTOR3.4@-6.906,-5.269
VREG_MOTOR4: C7_MOTOR4.2 R5_MOTOR4.2 U1_MOTOR4.4 | length 4
  Top Layer w0.125: -6.878,9.853 R5_MOTOR4.2@-6.473,10.258
  Top Layer w0.15: C7_MOTOR4.2@-7.1,8.93 -7.1,9.315 -7.086,9.467 -7.045,9.607 -6.975,9.736 -6.878,9.853
  Top Layer w0.2: C7_MOTOR4.2@-6.819,8.811 U1_MOTOR4.4@-5.106,7.099
pads on no net: H3.6 H4.1 H4.3 H4.4 IC1_MOTOR1.1 IC1_MOTOR1.2 IC1_MOTOR1.7 IC1_MOTOR1.10 IC1_MOTOR1.11 IC1_MOTOR1.17 IC1_MOTOR1.22 IC1_MOTOR1.25 IC1_MOTOR1.26 IC1_MOTOR1.28 IC1_MOTOR2.1 IC1_MOTOR2.2 IC1_MOTOR2.7 IC1_MOTOR2.10 IC1_MOTOR2.11 IC1_MOTOR2.17 IC1_MOTOR2.22 IC1_MOTOR2.25 IC1_MOTOR2.26 IC1_MOTOR2.28 IC1_MOTOR3.1 IC1_MOTOR3.2 IC1_MOTOR3.7 IC1_MOTOR3.10 IC1_MOTOR3.11 IC1_MOTOR3.17 IC1_MOTOR3.22 IC1_MOTOR3.25 IC1_MOTOR3.26 IC1_MOTOR3.28 IC1_MOTOR4.1 IC1_MOTOR4.2 IC1_MOTOR4.7 IC1_MOTOR4.10 IC1_MOTOR4.11 IC1_MOTOR4.17 IC1_MOTOR4.22 IC1_MOTOR4.25 IC1_MOTOR4.26 IC1_MOTOR4.28

## Polygon pours and split planes (outlines as drawn)
GND on Top Layer "HUGE" (solid, remove dead copper, pour order 80): -19.001,-13.756 -19.001,-12.079 cw(c-16.001,-12.079) -18.501,-10.421 ccw(c-21.001,-8.763) -18.001,-8.763 -18.001,8.765 ccw(c-21.001,8.765) -18.501,10.423 cw(c-16.001,12.082) -19.001,12.082 -19.001,13.758 cw(c-16.001,13.758) -18.123,15.88 -15.88,18.122 cw(c-13.759,16.001) -13.759,19.001 -10.83,19.001 ccw(c-10.83,22.001) -8.594,20.001 cw(c-6.358,18.001) -6.358,21.001 6.355,21.001 cw(c6.355,18.001) 8.591,20.001 ccw(c10.827,22.001) 10.827,19.001 13.756,19.001 cw(c13.756,16.001) 15.877,18.122 18.12,15.88 cw(c15.999,13.758) 18.999,13.758 18.999,12.082 cw(c15.999,12.082) 18.499,10.423 ccw(c20.999,8.765) 17.999,8.765 17.999,-8.763 ccw(c20.999,-8.763) 18.499,-10.421 cw(c15.999,-12.079) 18.999,-12.079 18.999,-13.756 cw(c15.999,-13.756) 18.12,-15.878 15.877,-18.12 cw(c13.756,-15.999) 13.756,-18.999 10.827,-18.999 ccw(c10.827,-21.999) 8.591,-19.999 cw(c6.355,-17.999) 6.355,-20.999 -6.358,-20.999 cw(c-6.358,-17.999) -8.594,-19.999 ccw(c-10.83,-21.999) -10.83,-18.999 -13.759,-18.999 cw(c-13.759,-15.999) -15.88,-18.12 -18.123,-15.878 cw(c-16.001,-13.756)
+VBAT on Top Layer "+VBAT_L01_P035" (solid, remove dead copper, pour order 35): 15.579,8.695 15.993,9.109 ccw(c14.197,10.905) 16.737,10.905 16.737,12.272 ccw(c15.457,12.272) 16.362,13.178 11.809,17.73 cw(c12.072,17.994) 11.7,17.994 11.7,18.2 cw(c12.183,18.2) 11.841,18.541 11.9,18.6 cw(c12.253,18.247) 12.253,18.746 15.554,18.746 19.324,14.976 19.324,9.4 ccw(c19.121,9.059) 18.918,8.718 15.4,5.2 14.326,6.273 15.626,7.573 15.026,8.173
+VBAT on Top Layer "+VBAT_L01_P033" (solid, remove dead copper, pour order 33): 7.609,12.991 8.309,12.291 11.391,15.373 10.109,16.591 8.309,14.891 8.909,14.291
GND on Top Layer "GND_BRIDGES2" (solid, remove dead copper, pour order 79): -6.709,-16.291 -3.844,-13.426 -11.092,-6.178 -13.957,-9.043 -13.25,-9.75 -12,-8.5 -9.348,-11.152 -10.598,-12.402 -9.891,-13.109 -8.641,-11.859 -5.99,-14.51 -7.24,-15.76
GND on Top Layer "GND_BRIDGES2" (solid, remove dead copper, pour order 75): 16.91,-8.238 14.045,-5.373 6.797,-12.62 9.662,-15.485 10.37,-14.778 9.12,-13.528 11.771,-10.877 13.021,-12.127 13.728,-11.42 12.478,-10.17 15.13,-7.518 16.38,-8.768
GND on Top Layer "GND_BRIDGES2" (solid, remove dead copper, pour order 73): 6.528,16.319 3.663,13.455 10.911,6.207 13.776,9.072 13.069,9.779 11.819,8.529 9.167,11.18 10.417,12.43 9.71,13.138 8.46,11.887 5.809,14.539 7.059,15.789
+VBAT on Top Layer "+VBAT_L01_P051" (solid, remove dead copper, pour order 51): 13.35,10.65 12.468,11.532 9.122,8.187 10.972,6.429 13.029,8.371 12.05,9.35
+VBAT on Top Layer "+VBAT_L01_P022" (solid, remove dead copper, pour order 22): -17.8,-8.5 -17.3,-9 -16.372,-9 -16.372,-11.428 -10.443,-17.357 -10.443,-18.999 -13.651,-18.999 cw(c-13.651,-16.459) -15.447,-18.255 -18.531,-15.171 cw(c-17.701,-14.342) -18.874,-14.342 -18.874,-11.663 cw(c-17.129,-11.663) -18.363,-10.429 -18.33,-10.396 ccw(c-19.523,-9.203) -17.836,-9.203 -17.836,-8.642
+VBAT on Top Layer "+VBAT_L01_P019" (solid, pour order 19): -10.083,16.8 -13.8,16.8 -16.049,14.551 -17.2,13.1 -17.926,11.16 -19.357,11.011 -18.655,18.853 -9.341,20.624
+VBAT on Top Layer "+VBAT_L01_P081" (solid, remove dead copper, pour order 81): -10.648,13.56 -11.348,12.86 -8.017,9.529 -7.031,10.568 -8.978,12.63 -9.348,12.26
+VBAT on Top Layer "+VBAT_L01_P012" (solid, pour order 12): 8.1,-18.6 9.7,-20.3 21.6,-17.9 20.4,-11 17.5,-11.4 15.134,-13.366 13.366,-15.134 8.3,-17.6
+VBAT on Top Layer "+VBAT_L01_P002" (solid, pour order 2): -6.575,-18.282 -6.604,-18.284 -6.634,-18.288 -6.662,-18.295 -6.69,-18.305 -6.716,-18.318 -6.742,-18.333 -6.765,-18.35 -6.787,-18.37 -6.807,-18.392 -6.824,-18.415 -6.84,-18.441 -6.852,-18.467 -6.862,-18.495 -6.869,-18.524 -6.874,-18.553 -6.875,-18.582 -6.875,-19.8 -6.874,-19.829 -6.869,-19.859 -6.862,-19.887 -6.852,-19.915 -6.84,-19.941 -6.824,-19.967 -6.807,-19.99 -6.787,-20.012 -6.765,-20.032 -6.742,-20.049 -6.716,-20.065 -6.69,-20.077 -6.662,-20.087 -6.634,-20.094 -6.604,-20.099 -6.575,-20.1 -3.625,-20.1 -3.596,-20.099 -3.566,-20.094 -3.538,-20.087 -3.51,-20.077 -3.484,-20.065 -3.458,-20.049 -3.435,-20.032 -3.413,-20.012 -3.393,-19.99 -3.376,-19.967 -3.36,-19.941 -3.348,-19.915 -3.338,-19.887 -3.331,-19.859 -3.326,-19.829 -3.325,-19.8 -3.325,-18.582 -3.326,-18.553 -3.331,-18.524 -3.338,-18.495 -3.348,-18.467 -3.36,-18.441 -3.376,-18.415 -3.393,-18.392 -3.413,-18.37 -3.435,-18.35 -3.458,-18.333 -3.484,-18.318 -3.51,-18.305 -3.538,-18.295 -3.566,-18.288 -3.596,-18.284 -3.625,-18.282
+VBAT on Top Layer "+VBAT_L01_P003" (solid, remove dead copper, pour order 3): 11.95,-14.35 12.72,-13.628 13.5,-14.4 12.72,-15.12 13.095,-15.495 11.595,-16.995 10.739,-16.139 10.739,-14.828 9.022,-12.996 9.809,-12.209
PHASE_A1 on Top Layer "PHASE_A1_L01_P061" (solid, remove dead copper, pour order 61): 8.561,-14.387 7.061,-15.887 8.261,-17.087 8.861,-16.487 9.361,-16.987 10.261,-16.087
PHASE_C2 on Top Layer "PHASE_C2_L01_P026" (solid, remove dead copper, pour order 26): 5.909,14.691 7.409,13.191 8.609,14.391 8.009,14.991 8.509,15.491 7.609,16.391
+VBAT on Top Layer "+VBAT_L01_P041" (solid, remove dead copper, pour order 41): -7.79,-12.962 -8.49,-12.262 -11.572,-15.344 -10.29,-16.562 -8.49,-14.862 -9.09,-14.262
+VBAT on Top Layer "+VBAT_L01_P048" (solid, remove dead copper, pour order 48): -6.291,14.509 -4.15,16.65 -7.269,19.769 -9.891,17.009 -8.191,15.209 -7.591,15.809
PHASE_C1 on Top Layer "PHASE_C1_L01_P059" (solid, remove dead copper, pour order 59): 15.279,-7.669 13.779,-9.169 14.979,-10.369 15.579,-9.769 16.079,-10.269 16.979,-9.369
+VBAT on Top Layer "+VBAT_L01_P038" (solid, remove dead copper, pour order 38): 11.411,-8.636 11.292,-8.755 cw(c11.21,-8.673) 11.21,-8.789 cw(c11.21,-8.833) 11.241,-8.802 12.54,-10.1 ccw(c12.527,-9.909) 12.629,-10.071 12.7,-10 14.384,-11.784 15.389,-10.779 12.303,-7.694 11.41,-8.635
+5V on Top Layer "+5V_L01_P025" (solid, remove dead copper, pour order 25): 10.148,-6.875 11.398,-8.125 14.273,-5.25 16.023,-5.25 16.637,-4.637 16.25,-4.25 16.023,-3.879 12.773,-4.25
+VBAT on Top Layer "+VBAT_L01_P024" (solid, remove dead copper, pour order 24): 14.277,-3.348 15.045,-2.58 15.255,-2.79 16.21,-1.835 14.869,-0.494 16.398,1.036 13.64,3.793 10.388,0.541
FB on Top Layer "FB_L01_P023" (solid, remove dead copper, pour order 23): 16.61,-3.278 15.408,-4.48 14.277,-3.348 14.843,-2.783 15.267,-3.207 15.903,-2.571
+VBAT on Top Layer "+VBAT_L01_P046" (solid, remove dead copper, pour order 46): -14.507,-6.245 -16.676,-4.076 -19.795,-7.195 -17.007,-9.845 -15.207,-8.145 -15.807,-7.545
+VBAT on Top Layer "+VBAT_L01_P037" (solid, remove dead copper, pour order 37): 6.91,-15.984 6.21,-16.684 9.292,-19.765 10.51,-18.484 8.81,-16.684 8.21,-17.284
+VBAT on Top Layer "+VBAT_L01_P049" (solid, remove dead copper, pour order 49): -9.749,-8.24 -9.4,-8.6 -10.674,-9.826 -10.907,-9.593 -12.707,-11.393 -13.505,-10.595 -12.231,-9.322 -12.831,-8.722 -11.031,-7.022
PHASE_B2 on Top Layer "PHASE_B2_L01_P027" (solid, remove dead copper, pour order 27): 9.268,11.332 10.768,9.832 11.968,11.032 11.368,11.632 11.868,12.132 10.968,13.032
PHASE_A2 on Top Layer "PHASE_A2_L01_P032" (solid, remove dead copper, pour order 32): 12.627,7.973 14.127,6.473 15.327,7.673 14.727,8.273 15.227,8.773 14.327,9.673
PHASE_C3 on Top Layer "PHASE_C3_L01_P056" (solid, remove dead copper, pour order 56): -6.141,-14.659 -7.641,-13.159 -8.841,-14.359 -8.241,-14.959 -8.741,-15.459 -7.841,-16.359
PHASE_B3 on Top Layer "PHASE_B3_L01_P057" (solid, remove dead copper, pour order 57): -9.5,-11.3 -11,-9.8 -12.2,-11 -11.6,-11.6 -12.1,-12.1 -11.2,-13
PHASE_A3 on Top Layer "PHASE_A3_L01_P058" (solid, remove dead copper, pour order 58): -12.859,-7.941 -14.359,-6.441 -15.559,-7.641 -14.959,-8.241 -15.459,-8.741 -14.559,-9.641
PHASE_B4 on Top Layer "PHASE_B4_L01_P053" (solid, remove dead copper, pour order 53): -11.35,9.45 -9.85,10.95 -11.05,12.15 -11.65,11.55 -12.15,12.05 -13.05,11.15
PHASE_A4 on Top Layer "PHASE_A4_L01_P054" (solid, remove dead copper, pour order 54): -7.991,12.809 -6.491,14.309 -7.691,15.509 -8.291,14.909 -8.791,15.409 -9.691,14.509
PHASE_C4 on Top Layer "PHASE_C4_L01_P052" (solid, remove dead copper, pour order 52): -14.709,6.091 -13.209,7.591 -14.409,8.791 -15.009,8.191 -15.509,8.691 -16.409,7.791
+VBAT on Top Layer "+VBAT_L01_P047" (solid, remove dead copper, pour order 47): -13.029,7.763 -12.329,8.463 -15.411,11.545 -16.629,10.263 -14.929,8.463 -14.329,9.063
PHASE_B1 on Top Layer "PHASE_B1_L01_P072" (solid, remove dead copper, pour order 72): 11.92,-11.028 10.42,-12.528 11.62,-13.728 12.22,-13.128 12.72,-13.628 13.62,-12.728
+VBAT on Bottom Layer "+VBAT_OUTER" (solid, remove dead copper, pour order 76): -19.001,-13.756 -19.001,-12.079 cw(c-16.001,-12.079) -18.501,-10.421 ccw(c-21.001,-8.763) -18.001,-8.763 -18.001,8.765 ccw(c-21.001,8.765) -18.501,10.423 cw(c-16.001,12.082) -19.001,12.082 -19.001,13.758 cw(c-16.001,13.758) -18.123,15.88 -15.88,18.122 cw(c-13.759,16.001) -13.759,19.001 -10.83,19.001 ccw(c-10.83,22.001) -8.594,20.001 cw(c-6.358,18.001) -6.358,21.001 6.355,21.001 cw(c6.355,18.001) 8.591,20.001 ccw(c10.827,22.001) 10.827,19.001 13.756,19.001 cw(c13.756,16.001) 15.877,18.122 18.12,15.88 cw(c15.999,13.758) 18.999,13.758 18.999,12.082 cw(c15.999,12.082) 18.499,10.423 ccw(c20.999,8.765) 17.999,8.765 17.999,-8.763 ccw(c20.999,-8.763) 18.499,-10.421 cw(c15.999,-12.079) 18.999,-12.079 18.999,-13.756 cw(c15.999,-13.756) 18.12,-15.878 15.877,-18.12 cw(c13.756,-15.999) 13.756,-18.999 10.827,-18.999 ccw(c10.827,-21.999) 8.591,-19.999 cw(c6.355,-17.999) 6.355,-20.999 -6.358,-20.999 cw(c-6.358,-17.999) -8.594,-19.999 ccw(c-10.83,-21.999) -10.83,-18.999 -13.759,-18.999 cw(c-13.759,-15.999) -15.88,-18.12 -18.123,-15.878 cw(c-16.001,-13.756)
GND on Bottom Layer "GND_L04_P074" (solid, remove dead copper, pour order 74): -15,-13.343 -15,-12.369 ccw(c-21,-8.764) -14,-8.764 -14,8.764 ccw(c-21,8.764) -15,12.369 -15,13.343 -13.343,15 -10.828,15 ccw(c-10.828,22) -5.929,17 5.929,17 ccw(c10.828,22) 10.828,15 13.343,15 15,13.343 15,12.369 ccw(c21,8.764) 14,8.764 14,-8.764 ccw(c21,-8.764) 15,-12.369 15,-13.343 13.343,-15 10.828,-15 ccw(c10.828,-22) 5.929,-17 -5.929,-17 ccw(c-10.828,-22) -10.828,-15 -13.343,-15
+VBAT on Bottom Layer "+VBAT_L04_P063" (solid, pour order 63): 12.2,-7.9 11.4,-8.7 11.4,-9.958 11.905,-10.463 12.938,-10.463 13.375,-10.026 13.626,-10.026 15.95,-12.35 16.6,-11.7 16.6,-11.289 13.211,-7.9 13,-7.9
+VBAT on Bottom Layer "+VBAT_L04_P062" (solid, pour order 62): -8.05,10.05 -7.15,10.95 -8.5,12.3 -8.5,15.8 -7.2,17.1 -8.6,18.5 -9.8,17.3 -9.8,11.8
GND on Bottom Layer "GND_L04_P070" (solid, remove dead copper, pour order 70): -13.986,6.816 -15.113,5.689 ccw(c-14.743,5.32) -15.266,5.32 -15.266,5.25 ccw(c-14.652,5.25) -15.086,4.816 ccw(c-14.845,5.058) -14.845,4.716 -13.986,4.716
GND on Bottom Layer "GND_L04_P069" (solid, remove dead copper, pour order 69): 3.839,16.839 5.002,18.002 cw(c5.513,17.49) 5.513,18.214 cw(c5.513,18.019) 5.651,18.157 5.757,18.051 cw(c5.219,17.513) 5.979,17.513 5.979,17.396 cw(c5.491,17.396) 5.836,17.05 5.514,16.728
+VBAT on Bottom Layer "+VBAT_L04_P065" (solid, remove dead copper, pour order 65): -10.425,-7.825 -8.561,-7.825 cw(c-8.561,-8.273) -8.244,-7.956 -5.502,-10.698 cw(c-5.983,-11.183) -5.3,-11.183 -5.3,-13.15 cw(c-6.748,-13.15) -5.724,-14.174 -7.775,-16.225 -8.117,-15.883 ccw(c-8.8,-16.565) -8.8,-15.6 -7.332,-14.132 ccw(c-9.039,-12.425) -6.625,-12.425 ccw(c-8.737,-12.425) -7.244,-10.931 -8.625,-9.55 ccw(c-8.944,-9.869) -8.945,-9.418 -10.555,-9.418
+VBAT on Bottom Layer "+VBAT_L04_P067" (solid, remove dead copper, pour order 67): 11.584,7.266 ccw(c13.635,7.266) 12.185,5.815 12.3,5.7 ccw(c13.507,6.907) 13.507,5.2 14.2,5.2 14.2,3.8 13.39,3.8 cw(c13.39,6.19) 11.7,4.5 10.554,5.646 cw(c11.407,6.5) 10.2,6.5 10.2,7.16 cw(c10.81,7.16) 10.379,7.591
GND on Inner GND 1 "HUGE" (solid, remove dead copper, pour order 20): -19.001,-13.756 -19.001,-12.079 cw(c-16.001,-12.079) -18.501,-10.421 ccw(c-21.001,-8.763) -18.001,-8.763 -18.001,8.765 ccw(c-21.001,8.765) -18.501,10.423 cw(c-16.001,12.082) -19.001,12.082 -19.001,13.758 cw(c-16.001,13.758) -18.123,15.88 -15.88,18.122 cw(c-13.759,16.001) -13.759,19.001 -10.83,19.001 ccw(c-10.83,22.001) -8.594,20.001 cw(c-6.358,18.001) -6.358,21.001 6.355,21.001 cw(c6.355,18.001) 8.591,20.001 ccw(c10.827,22.001) 10.827,19.001 13.756,19.001 cw(c13.756,16.001) 15.877,18.122 18.12,15.88 cw(c15.999,13.758) 18.999,13.758 18.999,12.082 cw(c15.999,12.082) 18.499,10.423 ccw(c20.999,8.765) 17.999,8.765 17.999,-8.763 ccw(c20.999,-8.763) 18.499,-10.421 cw(c15.999,-12.079) 18.999,-12.079 18.999,-13.756 cw(c15.999,-13.756) 18.12,-15.878 15.877,-18.12 cw(c13.756,-15.999) 13.756,-18.999 10.827,-18.999 ccw(c10.827,-21.999) 8.591,-19.999 cw(c6.355,-17.999) 6.355,-20.999 -6.358,-20.999 cw(c-6.358,-17.999) -8.594,-19.999 ccw(c-10.83,-21.999) -10.83,-18.999 -13.759,-18.999 cw(c-13.759,-15.999) -15.88,-18.12 -18.123,-15.878 cw(c-16.001,-13.756)
GND on Inner GND 2 "HUGE" (solid, remove dead copper, pour order 21): -19.001,-13.756 -19.001,-12.079 cw(c-16.001,-12.079) -18.501,-10.421 ccw(c-21.001,-8.763) -18.001,-8.763 -18.001,8.765 ccw(c-21.001,8.765) -18.501,10.423 cw(c-16.001,12.082) -19.001,12.082 -19.001,13.758 cw(c-16.001,13.758) -18.123,15.88 -15.88,18.122 cw(c-13.759,16.001) -13.759,19.001 -10.83,19.001 ccw(c-10.83,22.001) -8.594,20.001 cw(c-6.358,18.001) -6.358,21.001 6.355,21.001 cw(c6.355,18.001) 8.591,20.001 ccw(c10.827,22.001) 10.827,19.001 13.756,19.001 cw(c13.756,16.001) 15.877,18.122 18.12,15.88 cw(c15.999,13.758) 18.999,13.758 18.999,12.082 cw(c15.999,12.082) 18.499,10.423 ccw(c20.999,8.765) 17.999,8.765 17.999,-8.763 ccw(c20.999,-8.763) 18.499,-10.421 cw(c15.999,-12.079) 18.999,-12.079 18.999,-13.756 cw(c15.999,-13.756) 18.12,-15.878 15.877,-18.12 cw(c13.756,-15.999) 13.756,-18.999 10.827,-18.999 ccw(c10.827,-21.999) 8.591,-19.999 cw(c6.355,-17.999) 6.355,-20.999 -6.358,-20.999 cw(c-6.358,-17.999) -8.594,-19.999 ccw(c-10.83,-21.999) -10.83,-18.999 -13.759,-18.999 cw(c-13.759,-15.999) -15.88,-18.12 -18.123,-15.878 cw(c-16.001,-13.756)

## Keep-outs
Top Layer:
  region: 11.095,1.106 10.317,0.329 12.933,-2.288 13.711,-1.51

## Silkscreen, mask and mechanical layers (free items; w line width, h text height)
Top Overlay:
  text "Rev. 1 - LZ" at -3.183,-19.95 h1.5
Bottom Overlay:
  lines w0.084: -15,2 -15,9.5 15,9.5 15,2 -15,2
Bottom Solder:
  region: 1655 vertices and 0 holes, not listed, extent -17.416,-3.029 -15.835,3.219
Mechanical 15:
  circle w0.254: c0,0 r0.25
Mechanical 100:
  lines w0.013: -15,-13.343 -13.343,-15 -10.828,-15 cw(c-10.828,-22) -5.929,-17 5.929,-17 cw(c10.828,-22) 10.828,-15 13.343,-15 15,-13.343 15,-12.369 cw(c21,-8.764) 14,-8.764 14,8.764 cw(c21,8.764) 15,12.369 15,13.343 13.343,15 10.828,15 cw(c10.828,22) 5.929,17 -5.929,17 cw(c-10.828,22) -10.828,15 -13.343,15 -15,13.343 -15,12.369 cw(c-21,8.764) -14,8.764 -14,-8.764 cw(c-21,-8.764) -15,-12.369 -15,-13.343

## Text inside footprints (layer, text, board x,y; h text height)
H1: Top Overlay "GND +BAT" at -3.057,19.608 h1.6